# Altium PCB DA13_FPGA_edition.PcbDoc (part 1 of 3)
Units mm, origin at the board's own origin, x right, y up, seen from the top; angles counter-clockwise.
Board outline 118.01 x 92.01 mm, 2 copper layers (Top Layer, Bottom Layer); 473 components, 250 nets, 1417 pads, 16 vias.
Unrouted connection lines stored in the file: 993.
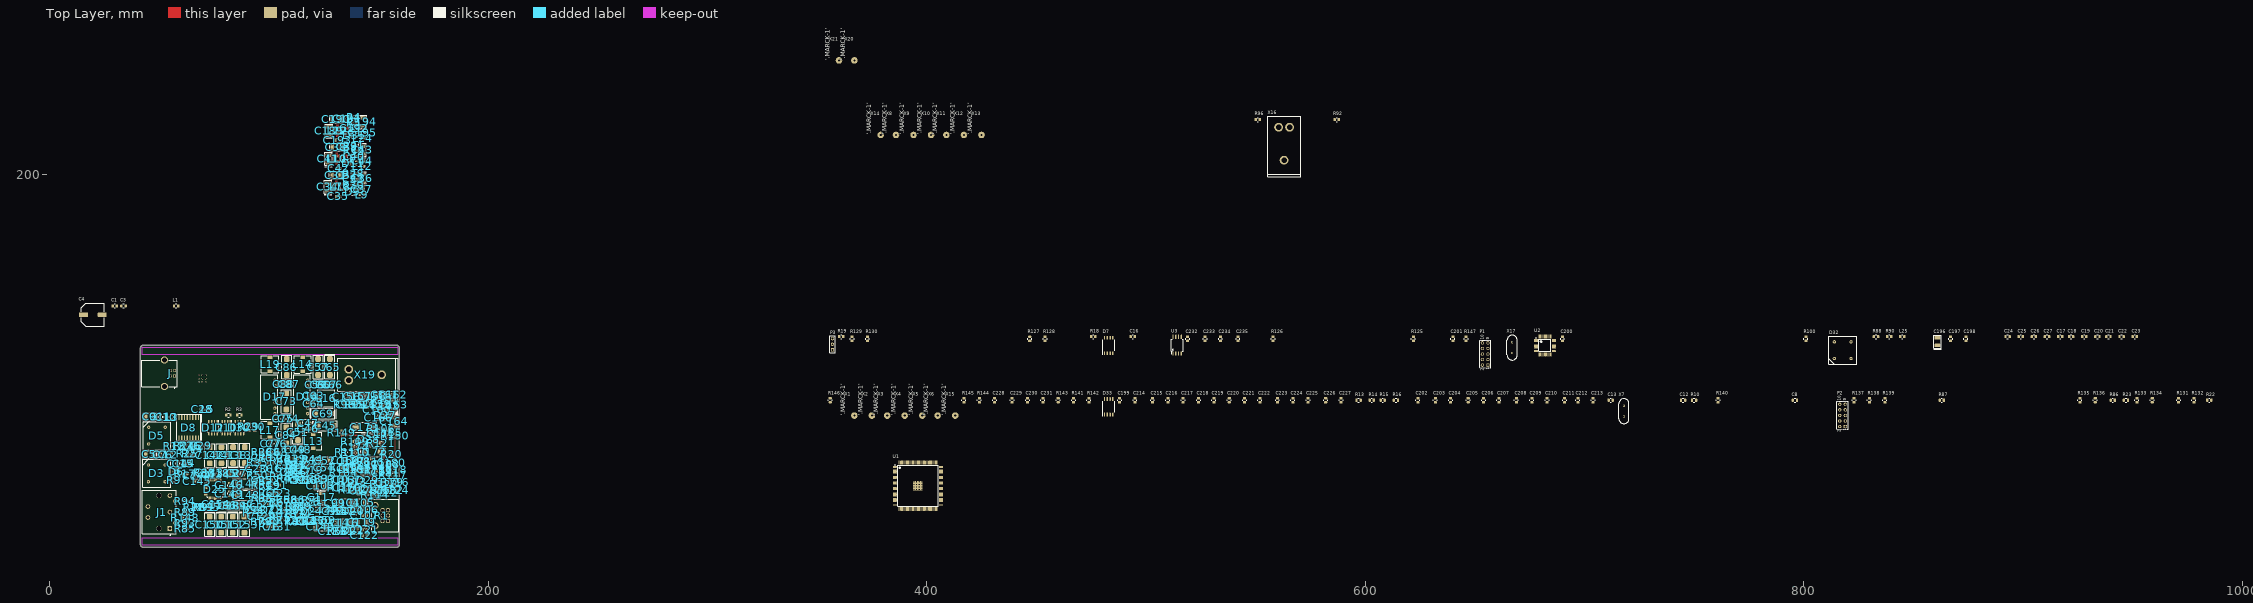
[diagram p0: Top Layer view]
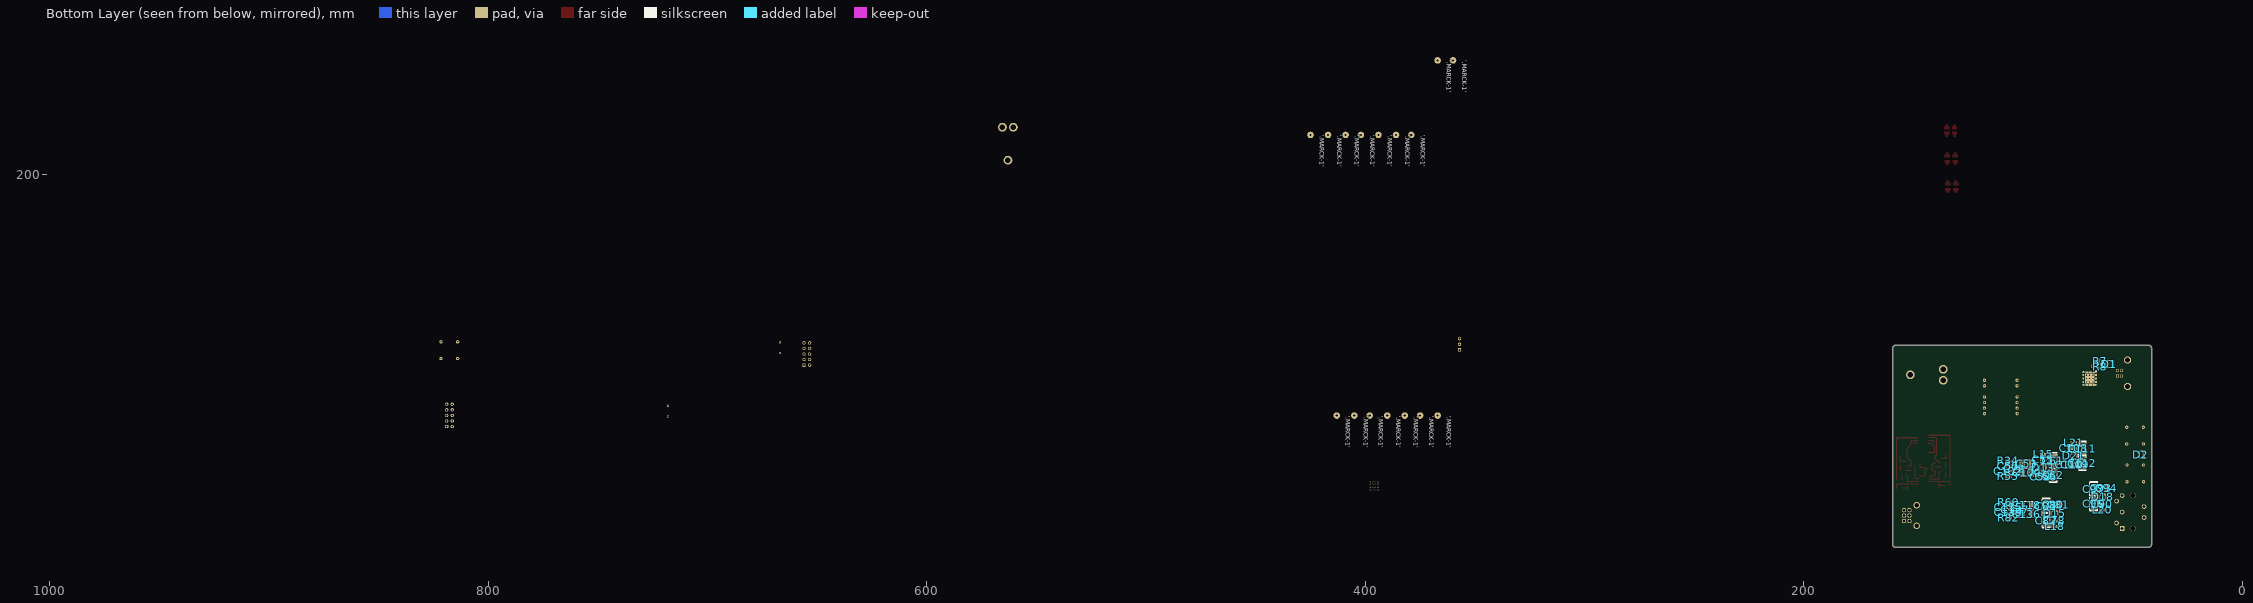
[diagram p1: Bottom Layer view, seen from below]

## Layer stack, top to bottom
Top Solder: solder mask 0.0102, Solder Resist, Dk 3.5
Top Layer: signal copper 0.0356
Dielectric 1: dielectric 0.32, FR-4, Dk 4.8
Bottom Layer: signal copper 0.0356
Bottom Solder: solder mask 0.0102, Solder Resist, Dk 3.5

## Board outline
41.396,31.104 ccw(c42.501,31.104) 42.501,29.999 158.301,29.999 ccw(c158.301,31.104) 159.406,31.104 159.406,120.904 ccw(c158.301,120.904) 158.301,122.009 42.501,122.009 ccw(c42.501,120.904) 41.396,120.904

## Design rules (kind name [scope] priority, off if disabled: settings)
Clearance [All] p1: gap=0.2 ignorepadtopadclearanceinfootprint=FALSE
PolygonConnect [All] p1: connectstyle=Relief reliefconductorwidth=0.254 reliefentries=4 polygonreliefangle="90 Angle" airgapwidth=0.254
RoutingVias [All] p1: holewidth=0.711 width=1.27 viastyle="Through Hole" minholewidth=0.711 minwidth=1.27 maxholewidth=0.711 maxwidth=1.27
SolderMaskExpansion [All] p1: expansion=0.102 istentingtop=FALSE
Width [All] p1: maxlimit=1 minlimit=0.254 preferedwidth=0.254
30 further rules are at their usual default settings.

## Classes and differential pairs
component class ha: C155 C156 C157 C158 C159 C160 C161 C162 C163 C164 C165 C166 C167 C168 C169 C170 C171 C172 C173 C174 C175 C176 C177 C178 C179 C180 C181 C182 C187 C188 D26 D27 D28 D29 R1 R11 R20 R98 R99 R101 R102 R103 R104 R105 R106 R107 R108 R109 R110 R111 R112 R113 R114 R115 R116 R117 R118 R119 R120 R121 R122 R123 R124 R149 R150 X19 X20 X21
component class DAC_4493: C2 C45 C46 C47 C48 C49 C50 C51 C52 C53 C54 C55 C56 C57 C58 C59 C60 C61 C62 C63 C64 C65 C66 C67 C68 C69 C70 C71 C72 C73 C74 C75 C76 C77 C78 C79 C80 C81 C82 C83 C84 C85 C86 C87 C88 C89 C90 C91 C92 C93 C94 C95 C96 C97 C98 C99 C100 C101 C102 C103 C104 C105 C106 C107 C108 C109 C110 C111 C112 C113 C114 C115 C116 C117 C118 C119 C120 C121 C122 C123 C124 C125 C126 C127 C128 C129 C130 C131 C132 C133 C134 C135 C136 C137 C138 C139 C140 C141 C142 C143 C144 C145 C146 C147 C148 C149 C150 C151 C152 C153 C154 C183 C184 C185 C186 C236 C237 D13 D14 D15 D16 D17 D18 D19 D20 D21 D22 D23 D24 D25 J1 L13 L14 L15 L16 L17 L18 L19 L20 L21 R6 R21 R33 R34 R35 R36 R37 R38 R39 R40 R41 R42 R43 R44 R45 R46 R47 R48 R49 R50 R51 R52 R53 R54 R55 R56 R57 R58 R59 R60 R61 R62 R63 R64 R65 R66 R67 R68 R69 R70 R71 R72 R73 R74 R75 R76 R77 R78 R79 R80 R81 R82 R83 R84 R85 R89 R91 R92 R93 R94 R95 R96 R97 R148 X8 X9 X10 X11 X12 X13 X14 X16
component class da12-mb: C1 C3 C4 C5 C6 C7 C8 C9 C10 C11 C12 C13 C14 C15 C16 C17 C18 C19 C20 C21 C22 C23 C24 C25 C26 C27 C28 C29 C30 C31 C32 C33 C34 C35 C36 C37 C38 C39 C40 C41 C42 C43 C44 C189 C190 C191 C192 C193 C194 C195 C196 C197 C198 C199 C200 C201 C202 C203 C204 C205 C206 C207 C208 C209 C210 C211 C212 C213 C214 C215 C216 C217 C218 C219 C220 C221 C222 C223 C224 C225 C226 C227 C228 C229 C230 C231 C232 C233 C234 C235 D1 D2 D3 D4 D5 D6 D7 D8 D9 D10 D11 D12 D30 D31 D32 D33 J L1 L2 L3 L4 L5 L6 L7 L8 L9 L10 L11 L12 L22 L23 L24 L25 P1 P2 P3 R2 R3 R4 R5 R7 R8 R9 R10 R12 R13 R14 R15 R16 R17 R18 R19 R22 R23 R24 R25 R26 R27 R28 R29 R30 R31 R32 R86 R87 R88 R90 R100 R125 R126 R127 R128 R129 R130 R131 R132 R133 R134 R135 R136 R137 R138 R139 R140 R141 R142 R143 R144 R145 R146 R147 U1 U2 U3 X1 X2 X3 X4 X5 X6 X7 X15 X17

## Components (designator, comment, footprint, x,y, rotation, side; value= is the part's Value field where it differs from the comment)
C1 "CC0805MRX7R9BB104" CAPC200X125X95L50N 29.647,140 r0 top value=0.1u
C2 "Обозначение при заказе" TANT_B 82.1,63.625 r0 top
C3 "CC0805MRX7R9BB104" CAPC200X125X95L50N 33.647,140 r0 top value=0.1u
C4 "EEEFK1A102AP" CAPAE1030X1050L320X90N 19.647,136 r0 top value=1mX10V
C5 "Обозначение при заказе" TANT_B 47.235,72.253 r180 top
C6 "CC0805JRNPO9BN160" CAPC200X125X95L50N 52.996,72.101 r90 top value=16p
C7 "CC0805MRX7R9BB104" CAPC200X125X95L50N 50.491,72.101 r90 top value=0.1u
C8 "CC0805MRX7R9BB104" CAPC200X125X95L50N 796,97 r0 top value=0.1u
C9 "Обозначение при заказе" TANT_B 47.335,89.469 r180 top
C10 "CC0805JRNPO9BN160" CAPC200X125X95L50N 53.096,89.35 r90 top value=16p
C11 "CC0805MRX7R9BB104" CAPC200X125X95L50N 50.591,89.4 r90 top value=0.1u
C12 "CC0805JRNPO7BN220" CAPC200X125X95L50N 745,97 r0 top value=22p
C13 "CC0805JRNPO7BN220" CAPC200X125X95L50N 712,97 r0 top value=22p
C14 "CC0805JRNPO9BN160" CAPC200X125X95L50N 58.4,68.134 r90 top value=16p
C15 "CC0805MRX7R9BB104" CAPC200X125X95L50N 60.904,68.134 r90 top value=0.1u
C16 "CC0805MRX7R9BB104" CAPC200X125X95L50N 494,126 r0 top value=0.1u
C17 "CC0805MRX7R9BB104" CAPC200X125X95L50N 917,126 r0 top value=0.1u
C18 "CC0805MRX7R9BB104" CAPC200X125X95L50N 922,126 r0 top value=0.1u
C19 "CC0805MRX7R9BB104" CAPC200X125X95L50N 928,126 r0 top value=0.1u
C20 "CC0805MRX7R9BB104" CAPC200X125X95L50N 934,126 r0 top value=0.1u
C21 "CC0805MRX7R9BB104" CAPC200X125X95L50N 939,126 r0 top value=0.1u
C22 "CC0805MRX7R9BB104" CAPC200X125X95L50N 945,126 r0 top value=0.1u
C23 "CC0805MRX7R9BB104" CAPC200X125X95L50N 951,126 r0 top value=0.1u
C24 "CC0805MRX7R9BB104" CAPC200X125X95L50N 893,126 r0 top value=0.1u
C25 "CC0805MRX7R9BB104" CAPC200X125X95L50N 899,126 r0 top value=0.1u
C26 "CC0805MRX7R9BB104" CAPC200X125X95L50N 905,126 r0 top value=0.1u
C27 "CC0805MRX7R9BB104" CAPC200X125X95L50N 911,126 r0 top value=0.1u
C28 "CC0805MRX7R9BB104" CAPC200X125X95L50N 69.496,92.8 r270 top value=0.1u
C29 "CC0805MRX7R9BB104" CAPC200X125X95L50N 69.013,76.3 r270 top value=0.1u
C30 "GRM31CR71A226KE15L" CAPC320X160X180L55 93.5,84.8 r270 top value=22u
C31 "Обозначение при заказе" TANT_B 132.289,199.523 r180 top
C32 "CC0805MRX7R9BB104" CAPC200X125X95L50N 135.546,199.673 r270 top value=0.1u
C33 "CC0805MRX7R9BB101" CAPC200X125X95L50N 138.65,197.761 r180 top value=100p
C34 "Обозначение при заказе" TANT_B 126.889,192.514 r90 top
C35 "CC0805MRX7R9BB104" CAPC200X125X95L50N 131.6,189.962 r180 top value=0.1u
C36 "Обозначение при заказе" TANT_B 142.556,196.523 r90 top
C37 "CC0805MRX7R9BB104" CAPC200X125X95L50N 142.4,193.266 r180 top value=0.1u
C38 "Обозначение при заказе" TANT_B 132.439,212.339 r180 top
C39 "CC0805MRX7R9BB104" CAPC200X125X95L50N 135.696,212.539 r270 top value=0.1u
C40 "CC0805MRX7R9BB101" CAPC200X125X95L50N 138.8,208.174 r180 top value=100p
C41 "Обозначение при заказе" TANT_B 127.125,205.331 r90 top
C42 "CC0805MRX7R9BB104" CAPC200X125X95L50N 131.8,202.779 r180 top value=0.1u
C43 "Обозначение при заказе" TANT_B 142.656,209.439 r90 top
C44 "CC0805MRX7R9BB104" CAPC200X125X95L50N 142.6,206.183 r180 top value=0.1u
C45 "Обозначение при заказе" TANT_D 122.2,85.3 r0 top
C46 "CC0805MRX7R9BB104" CAPC200X125X95L50N 117.894,83.993 r180 top value=0.1u
C47 "CC0805MRX7R9BB104" CAPC200X125X95L50N 117.894,86.5 r180 top value=0.1u
C48 "CC0805MRX7R9BB104" CAPC200X125X95L50N 114.511,74.525 r270 top value=0.1u
C49 "CC0805MRX7R9BB104" CAPC200X125X95L50N 112.006,74.526 r270 top value=0.1u
C50 "CC0805MRX7R9BB104" CAPC200X125X95L50N 106.65,66.975 r180 bottom value=0.1u
C51 "Обозначение при заказе" TANT_D 113.2,78.832 r90 top
C52 "Обозначение при заказе" TANT_B 123.875,69.45 r0 top
C53 "Обозначение при заказе" TANT_B 96.475,67.95 r0 bottom
C54 "CC0805MRX7R9BB104" CAPC200X125X95L50N 125.125,66.275 r0 top value=0.1u
C55 "CC0805MRX7R9BB104" CAPC200X125X95L50N 90.761,69.8 r0 bottom value=0.1u
C56 "CC0805MRX7R9BB104" CAPC200X125X95L50N 89.456,62.2 r270 bottom value=0.1u
C57 "Обозначение при заказе" TANT_D 122.4,108.5 r90 top
C58 "CC0805MRX7R9BB104" CAPC200X125X95L50N 91.961,62.2 r270 bottom value=0.1u
C59 "CC0805MRX7R9BB104" CAPC200X125X95L50N 121.4,104.15 r270 top value=0.1u
C60 "CC0805MRX7R9BB104" CAPC200X125X95L50N 123.904,104.15 r270 top value=0.1u
C61 "Обозначение при заказе" TANT_B 86.2,71.2 r270 bottom
C62 "Обозначение при заказе" TANT_B 86.2,61.1 r90 bottom
C63 "CC0805MRX7R9BB104" CAPC200X125X95L50N 120.4,99.05 r270 top value=0.1u
C64 "CC0805MRX7R9BB104" CAPC200X125X95L50N 120.4,95.346 r90 top value=0.1u
C65 "Обозначение при заказе" TANT_D 127.8,115.8 r270 top
C66 "CC0805MRX7R9BB104" CAPC200X125X95L50N 128.913,104.15 r90 top value=0.1u
C67 "CC0805MRX7R9BB104" CAPC200X125X95L50N 126.409,104.15 r90 top value=0.1u
C68 "CC0805MRX7R9BB104" CAPC200X125X95L50N 103.9,73.175 r0 top value=0.1u
C69 "Обозначение при заказе" TANT_D 128.378,90.939 r180 top
C70 "CC0805MRX7R9BB104" CAPC200X125X95L50N 96.9,70.875 r0 top value=0.1u
C71 "CC0805MRX7R9BB104" CAPC200X125X95L50N 116.975,69.5 r90 top value=0.1u
C72 "CC0805MRX7R9BB104" CAPC200X125X95L50N 103.675,65.775 r270 bottom value=0.1u
C73 "Обозначение при заказе" TANT_D 107.9,92.8 r90 top
C74 "CC0805MRX7R9BB104" CAPC200X125X95L50N 109.104,88.494 r270 top value=0.1u
C75 "CC0805MRX7R9BB104" CAPC200X125X95L50N 106.6,88.494 r270 top value=0.1u
C76 "CC0805MRX7R9BB104" CAPC200X125X95L50N 103.504,77.146 r270 top value=0.1u
C77 "CC0805MRX7R9BB104" CAPC200X125X95L50N 101,77.146 r270 top value=0.1u
C78 "CC0805MRX7R9BB104" CAPC200X125X95L50N 85.537,41.971 r180 bottom value=0.1u
C79 "CC0805MRX7R9BB104" CAPC200X125X95L50N 107.675,65.775 r90 top value=0.1u
C80 "CC0805MRX7R9BB104" CAPC200X125X95L50N 86.123,49.4 r90 bottom value=0.1u
C81 "CC0805MRX7R9BB104" CAPC200X125X95L50N 83.619,49.4 r90 bottom value=0.1u
C82 "Обозначение при заказе" TANT_B 89.393,40.386 r90 bottom
C83 "Обозначение при заказе" TANT_B 89.379,50.486 r270 bottom
C84 "Обозначение при заказе" TANT_D 107.9,77.387 r90 top
C85 "CC0805MRX7R9BB104" CAPC200X125X95L50N 96.85,60.575 r180 top value=0.1u
C86 "Обозначение при заказе" TANT_D 108.1,108.5 r90 top
C87 "CC0805MRX7R9BB104" CAPC200X125X95L50N 109.202,104.194 r270 top value=0.1u
C88 "CC0805MRX7R9BB104" CAPC200X125X95L50N 106.698,104.194 r270 top value=0.1u
C89 "CC0805MRX7R9BB104" CAPC200X125X95L50N 122.2,61.1 r180 top value=0.1u
C90 "CC0805MRX7R9BB104" CAPC200X125X95L50N 63.844,49.486 r180 bottom value=0.1u
C91 "CC0805MRX7R9BB104" CAPC200X125X95L50N 103.875,58.275 r0 top value=0.1u
C92 "CC0805MRX7R9BB104" CAPC200X125X95L50N 114.675,60.55 r270 top value=0.1u
C93 "CC0805MRX7R9BB104" CAPC200X125X95L50N 64.344,56.914 r90 bottom value=0.1u
C94 "CC0805MRX7R9BB104" CAPC200X125X95L50N 61.839,56.914 r90 bottom value=0.1u
C95 "CC0805MRX7R9BB104" CAPC200X125X95L50N 110.05,64.05 r90 top value=0.1u
C96 "Обозначение при заказе" TANT_B 67.7,48 r90 bottom
C97 "Обозначение при заказе" TANT_B 67.7,58.1 r270 bottom
C98 "CC0805MRX7R9BB104" CAPC200X125X95L50N 129.131,46.352 r270 top value=0.1u
C99 "CC0805MRX7R9BB104" CAPC200X125X95L50N 130.259,50.056 r90 top value=0.1u
C100 "Обозначение при заказе" TANT_B 99.925,64 r180 bottom
C101 "CC0805MRX7R9BB104" CAPC200X125X95L50N 119.3,60.525 r90 top value=0.1u
C102 "CC0805MRX7R9BB104" CAPC200X125X95L50N 106.625,64.65 r0 bottom value=0.1u
C103 "Обозначение при заказе" TANT_B 125.35,58 r180 top
C104 "Обозначение при заказе" TANT_B 133.516,50.252 r0 top
C105 "Обозначение при заказе" TANT_B 143.616,50.252 r180 top
C106 "CC0805MRX7R9BB104" CAPC200X125X95L50N 143.716,46.995 r0 top value=0.1u
C107 "CC0805MRX7R9BB104" CAPC200X125X95L50N 143.716,44.491 r0 top value=0.1u
C108 "CC0805MRX7R9BB104" CAPC200X125X95L50N 76.77,75.014 r0 bottom value=0.1u
C109 "CC0805MRX7R9BB104" CAPC200X125X95L50N 76.17,67.5 r270 bottom value=0.1u
C110 "CC0805MRX7R9BB104" CAPC200X125X95L50N 78.674,67.5 r270 bottom value=0.1u
C111 "Обозначение при заказе" TANT_B 72.914,76.608 r270 bottom
C112 "Обозначение при заказе" TANT_B 72.914,66.6 r90 bottom
C113 "CC0805MRX7R9BB104" CAPC200X125X95L50N 129.031,37.335 r270 top value=0.1u
C114 "CC0805MRX7R9BB104" CAPC200X125X95L50N 130.159,41.083 r90 top value=0.1u
C115 "CC0805MRX7R9BB104" CAPC200X125X95L50N 106.425,48.15 r180 bottom value=0.1u
C116 "Обозначение при заказе" TANT_B 136.416,41.192 r180 top
C117 "Обозначение при заказе" TANT_B 124,50.992 r90 top
C118 "Обозначение при заказе" TANT_B 96.525,49.025 r0 bottom
C119 "Обозначение при заказе" TANT_B 140.516,41.235 r0 top
C120 "CC0805MRX7R9BB104" CAPC200X125X95L50N 125.15,47.6 r0 top value=0.1u
C121 "CC0805MRX7R9BB104" CAPC200X125X95L50N 143.716,37.935 r0 top value=0.1u
C122 "CC0805MRX7R9BB104" CAPC200X125X95L50N 143.716,35.431 r0 top value=0.1u
C123 "CC0805MRX7R9BB104" CAPC200X125X95L50N 103.825,54.5 r0 top value=0.1u
C124 "CC0805MRX7R9BB104" CAPC200X125X95L50N 96.8,49.85 r0 top value=0.1u
C125 "CC0805MRX7R9BB104" CAPC200X125X95L50N 109.925,48.675 r90 top value=0.1u
C126 "CC0805MRX7R9BB104" CAPC200X125X95L50N 116.95,50.7 r90 top value=0.1u
C127 "CC0805MRX7R9BB104" CAPC200X125X95L50N 103.5,46.95 r270 bottom value=0.1u
C128 "CC0805MRX7R9BB104" CAPC200X125X95L50N 107.625,46.95 r270 top value=0.1u
C129 "CC0805MRX7R9BB104" CAPC200X125X95L50N 96.75,44 r180 top value=0.1u
C130 "CC0805MRX7R9BB104" CAPC200X125X95L50N 122.175,42.3 r180 top value=0.1u
C131 "CC0805MRX7R9BB104" CAPC200X125X95L50N 103.825,39.375 r0 top value=0.1u
C132 "CC0805MRX7R9BB104" CAPC200X125X95L50N 114.625,41.7 r270 top value=0.1u
C133 "CC0805MRX7R9BB104" CAPC200X125X95L50N 109.925,45.2 r90 top value=0.1u
C134 "CC0805MRX7R9BB104" CAPC200X125X95L50N 76,63.1 r180 top value=0.1u
C135 "Обозначение при заказе" TANT_D 88.925,68.331 r90 top
C136 "Обозначение при заказе" TANT_B 100.05,45.05 r180 bottom
C137 "CC0805MRX7R9BB104" CAPC200X125X95L50N 119.25,41.7 r90 top value=0.1u
C138 "Обозначение при заказе" TANT_D 83.625,68.331 r90 top
C139 "CC0805MRX7R9BB104" CAPC200X125X95L50N 106.425,45.825 r0 bottom value=0.1u
C140 "Обозначение при заказе" TANT_B 125.35,39.2 r180 top
C141 "Обозначение при заказе" TANT_D 78.325,68.225 r90 top
C142 "Обозначение при заказе" TANT_D 73.025,68.225 r90 top
C143 "CC0805MRX7R9BB104" CAPC200X125X95L50N 73.05,64.025 r270 top value=0.1u
C144 "CC0805MRX7R9BB104" CAPC200X125X95L50N 67.275,62.5 r0 top value=0.1u
C145 "CC0805KKX7R9BB105" CAPC200X125X95L50N 67.275,60.15 r0 top value=1u
C146 "CC0805MRX7R9BB104" CAPC200X125X95L50N 81.988,58.179 r270 top value=0.1u
C147 "Обозначение при заказе" TANT_D 85.694,58.925 r0 top
C148 "Обозначение при заказе" TANT_D 85.694,53.675 r0 top
C149 "CC0805MRX7R9BB104" CAPC200X125X95L50N 81.988,54.425 r270 top value=0.1u
C150 "Обозначение при заказе" TANT_D 72.936,43.869 r270 top
C151 "Обозначение при заказе" TANT_D 78.225,43.869 r270 top
C152 "Обозначение при заказе" TANT_D 83.525,43.869 r270 top
C153 "Обозначение при заказе" TANT_D 88.825,43.869 r270 top
C154 "CC0805MRX7R9BB104" CAPC200X125X95L50N 75.9,49.625 r0 top value=0.1u
C155 "CC0805MRX7R9BB104" CAPC200X125X95L50N 137.019,94.835 r270 top value=0.1u
C156 "CC0805MRX7R9BB104" CAPC200X125X95L50N 135.4,98.68 r90 top value=0.1u
C157 "Обозначение при заказе" TANT_B 138.7,98.742 r0 top
C158 "Обозначение при заказе" TANT_B 149.1,98.742 r180 top
C159 "CC0805MRX7R9BB104" CAPC200X125X95L50N 149.3,95.084 r0 top value=0.1u
C160 "CC0805MRX7R9BB104" CAPC200X125X95L50N 149.3,92.58 r0 top value=0.1u
C161 "CC0805MRX7R9BB104" CAPC200X125X95L50N 153.059,99.594 r180 top value=0.1u
C162 "CC0805MRX7R9BB104" CAPC200X125X95L50N 156.768,99.594 r0 top value=0.1u
C163 "Обозначение при заказе" TANT_B 157.018,93.094 r90 top
C164 "Обозначение при заказе" TANT_B 157.1,89.085 r270 top
C165 "CC0805MRX7R9BB104" CAPC200X125X95L50N 154.411,82.15 r270 top value=0.1u
C166 "CC0805MRX7R9BB104" CAPC200X125X95L50N 150.013,89.1 r90 top value=0.1u
C167 "CC0805MRX7R9BB104" CAPC200X125X95L50N 135.696,60.787 r90 top value=0.1u
C168 "CC0805MRX7R9BB104" CAPC200X125X95L50N 134.991,69.517 r270 top value=0.1u
C169 "CC0805MRX7R9BB104" CAPC200X125X95L50N 137.496,65.496 r90 top value=0.1u
C170 "CC0805MRX7R9BB104" CAPC200X125X95L50N 135.704,57.083 r270 top value=0.1u
C171 "CC0805MRX7R9BB104" CAPC200X125X95L50N 151.306,81.4 r0 top value=0.1u
C172 "Обозначение при заказе" TANT_D 150.8,73.594 r180 top
C173 "Обозначение при заказе" TANT_D 147,84.6 r180 top
C174 "CC0805MRX7R9BB104" CAPC200X125X95L50N 139.3,75.596 r180 top value=0.1u
C175 "CC0805MRX7R9BB104" CAPC200X125X95L50N 146.8,65.346 r270 top value=0.1u
C176 "CC0805MRX7R9BB104" CAPC200X125X95L50N 148.4,56.391 r0 top value=0.1u
C177 "Обозначение при заказе" TANT_B 143.5,65.6 r90 top
C178 "Обозначение при заказе" TANT_B 141.465,55.639 r0 top
C179 "CC0805MRX7R9BB104" CAPC200X125X95L50N 155.004,59.683 r90 top value=0.1u
C180 "CC0805MRX7R9BB104" CAPC200X125X95L50N 156.1,68.5 r270 top value=0.1u
C181 "CC0805MRX7R9BB104" CAPC200X125X95L50N 153.3,63.9 r90 top value=0.1u
C182 "CC0805MRX7R9BB104" CAPC200X125X95L50N 155.004,55.979 r270 top value=0.1u
C183 "CC0805MRX7R9BB104" CAPC200X125X95L50N 110.05,67.5 r90 top value=0.1u
C184 "Обозначение при заказе" TANT_B 82,48.9 r0 top
C185 "CC0805MRX7R9BB104" CAPC200X125X95L50N 78.9,63.7 r90 top value=0.1u
C186 "CC0805MRX7R9BB104" CAPC200X125X95L50N 78.85,49 r270 top value=0.1u
C187 "CC0805MRX7R9BB104" CAPC200X125X95L50N 137.496,69.204 r270 top value=0.1u
C188 "CC0805MRX7R9BB104" CAPC200X125X95L50N 153.3,67.9 r270 top value=0.1u
C189 "Обозначение при заказе" TANT_B 127.425,218.192 r90 top
C190 "Обозначение при заказе" TANT_B 132.4,225.2 r180 top
C191 "CC0805MRX7R9BB104" CAPC200X125X95L50N 135.656,225.4 r270 top value=0.1u
C192 "CC0805MRX7R9BB101" CAPC200X125X95L50N 138.9,221.034 r180 top value=100p
C193 "CC0805MRX7R9BB104" CAPC200X125X95L50N 131.281,215.596 r180 top value=0.1u
C194 "Обозначение при заказе" TANT_B 142.756,222.3 r90 top
C195 "CC0805MRX7R9BB104" CAPC200X125X95L50N 142.814,219.044 r180 top value=0.1u
C196 "Обозначение при заказе" TANT_B 861,122 r90 top
C197 "CC0805JRNPO9BN160" CAPC200X125X95L50N 867,125 r90 top value=16p
C198 "CC0805MRX7R9BB104" CAPC200X125X95L50N 874,125 r90 top value=0.1u
C199 "CC0805MRX7R9BB104" CAPC200X125X95L50N 488,97 r90 top value=0.1u
C200 "CC0805JRNPO7BN220" CAPC200X125X95L50N 690,125 r90 top value=22p
C201 "CC0805JRNPO7BN220" CAPC200X125X95L50N 640,125 r90 top value=22p
C202 "CC0805MRX7R9BB104" CAPC200X125X95L50N 624,97 r90 top value=0.1u
C203 "CC0805MRX7R9BB104" CAPC200X125X95L50N 632,97 r90 top value=0.1u
C204 "CC0805MRX7R9BB104" CAPC200X125X95L50N 639,97 r90 top value=0.1u
C205 "CC0805MRX7R9BB104" CAPC200X125X95L50N 647,97 r90 top value=0.1u
C206 "CC0805MRX7R9BB104" CAPC200X125X95L50N 654,97 r90 top value=0.1u
C207 "CC0805MRX7R9BB104" CAPC200X125X95L50N 661,97 r90 top value=0.1u
C208 "CC0805MRX7R9BB104" CAPC200X125X95L50N 669,97 r90 top value=0.1u
C209 "CC0805MRX7R9BB104" CAPC200X125X95L50N 676,97 r90 top value=0.1u
C210 "CC0805MRX7R9BB104" CAPC200X125X95L50N 683,97 r90 top value=0.1u
C211 "CC0805MRX7R9BB104" CAPC200X125X95L50N 691,97 r90 top value=0.1u
C212 "CC0805MRX7R9BB104" CAPC200X125X95L50N 697,97 r90 top value=0.1u
C213 "CC0805MRX7R9BB104" CAPC200X125X95L50N 704,97 r90 top value=0.1u
C214 "CC0805MRX7R9BB104" CAPC200X125X95L50N 495,97 r90 top value=0.1u
C215 "CC0805MRX7R9BB104" CAPC200X125X95L50N 503,97 r90 top value=0.1u
C216 "CC0805MRX7R9BB104" CAPC200X125X95L50N 510,97 r90 top value=0.1u
C217 "CC0805MRX7R9BB104" CAPC200X125X95L50N 517,97 r90 top value=0.1u
C218 "CC0805MRX7R9BB104" CAPC200X125X95L50N 524,97 r90 top value=0.1u
C219 "CC0805MRX7R9BB104" CAPC200X125X95L50N 531,97 r90 top value=0.1u
C220 "CC0805MRX7R9BB104" CAPC200X125X95L50N 538,97 r90 top value=0.1u
C221 "CC0805MRX7R9BB104" CAPC200X125X95L50N 545,97 r90 top value=0.1u
C222 "CC0805MRX7R9BB104" CAPC200X125X95L50N 552,97 r90 top value=0.1u
C223 "CC0805MRX7R9BB104" CAPC200X125X95L50N 560,97 r90 top value=0.1u
C224 "CC0805MRX7R9BB104" CAPC200X125X95L50N 567,97 r90 top value=0.1u
C225 "CC0805MRX7R9BB104" CAPC200X125X95L50N 574,97 r90 top value=0.1u
C226 "CC0805MRX7R9BB104" CAPC200X125X95L50N 582,97 r90 top value=0.1u
C227 "CC0805MRX7R9BB104" CAPC200X125X95L50N 589,97 r90 top value=0.1u
C228 "CC0805MRX7R9BB104" CAPC200X125X95L50N 431,97 r90 top value=0.1u
C229 "CC0805MRX7R9BB104" CAPC200X125X95L50N 439,97 r90 top value=0.1u
C230 "CC0805MRX7R9BB104" CAPC200X125X95L50N 446,97 r90 top value=0.1u
C231 "CC0805MRX7R9BB104" CAPC200X125X95L50N 453,97 r90 top value=0.1u
C232 "CC0805MRX7R9BB104" CAPC200X125X95L50N 519,125 r90 top value=0.1u
C233 "CC0805MRX7R9BB104" CAPC200X125X95L50N 527,125 r90 top value=0.1u
C234 "CC0805MRX7R9BB104" CAPC200X125X95L50N 534,125 r90 top value=0.1u
C235 "CC0805MRX7R9BB104" CAPC200X125X95L50N 542,125 r90 top value=0.1u
C236 "CC0805MRX7R9BB104" CAPC200X125X95L50N 95.85,65.725 r270 top value=0.1u
C237 "CC0805MRX7R9BB104" CAPC200X125X95L50N 95.875,46.925 r270 top value=0.1u
D1 "USBLC6-4SC6" SOT23-6P95_280X145L45X40N 60.6,113.4 r0 bottom
D2 "SN74LVC1G14DBVR" SOT23-5P95_280X145L45X40N 46.2,72.1 r90 bottom value=SN74LVC1G14
D3 "Обозначение при заказе" DIL4 45,67.455 r270 top
D4 "Обозначение при заказе" "48-QFN (6x6)" 69.6,106.9 r270 bottom
D5 "Обозначение при заказе" DIL4 45.1,84.671 r270 top
D6 "Обозначение при заказе" SOT23-5P95_280X145L45X40N 57.7,64.334 r270 top
D7 "W25Q32JVSS" SOIC8P127_528X790X100L65X41N 483,122 r90 top value=W25Q32
D8 "Обозначение при заказе" adum1400 63.379,84.5 r180 top
D9 "Обозначение при заказе" SOT23-5P95_280X145L45X40N 138.3,192.123 r270 top
D10 "Обозначение при заказе" SOIC8P127_490X600X175L65X42N 80.5,84.5 r270 top
D11 "Обозначение при заказе" SOT23-5P95_280X145L45X40N 138.5,205.039 r270 top
D12 "Обозначение при заказе" SOIC8P127_490X600X175L65X42N 74.5,84.5 r270 top
D13 "Обозначение при заказе" SOT23-5P95_280X145L45X40N 90.861,66.3 r0 bottom
D14 "Обозначение при заказе" AM3D-0509DH30Z 116.33,106.12 r270 top
D15 "Обозначение при заказе" SOT23-5P95_280X145L45X40N 85.493,45.386 r180 bottom
D16 "Обозначение при заказе" SOIC8P127_490X600X175L65X42N 101.3,65.775 r90 top
D17 "Обозначение при заказе" AM3D-0509SZ 101.43,106.12 r270 top
D18 "Обозначение при заказе" SOT23-5P95_280X145L45X40N 63.7,52.9 r180 bottom
D19 "Обозначение при заказе" SOIC8P127_490X600X175L83X42N 119.625,65 r0 top
D20 "Обозначение при заказе" SOP65P490X110-9N 138.516,46.352 r0 top
D21 "Обозначение при заказе" SOT23-5P95_280X145L45X40N 76.8,71.6 r0 bottom
D22 "Обозначение при заказе" SOP65P490X110-9N 138.416,37.435 r0 top
D23 "Обозначение при заказе" SOIC8P127_490X600X175L65X42N 101.275,46.95 r90 top
D24 "Обозначение при заказе" SOIC8P127_490X600X175L83X42N 119.6,46.275 r0 top
D25 "Обозначение при заказе" QFP50P900X900X160-48N 75.373,56.461 r0 top
D26 "Обозначение при заказе" SOP65P490X110-9N 143.9,94.985 r0 top
D27 "Обозначение при заказе" SOP65P490X110-9N 153.018,90.209 r270 top
D28 "LM258DR" SOIC8P127_490X600X175L83X42N 145.5,79.194 r0 top value=LM258
D29 "LM258DR" SOIC8P127_490X600X175L83X42N 145.1,60.496 r0 top value=LM258
D30 "Обозначение при заказе" SOIC8P127_490X600X175L65X42N 86.5,84.5 r270 top
D31 "Обозначение при заказе" SOT23-5P95_280X145L45X40N 138.8,217.9 r270 top
D32 "Обозначение при заказе" DIL4 814,116 r0 top
D33 "W25Q32JVSS" SOIC8P127_528X790X100L65X41N 483,94 r90 top value=W25Q32
J "USB-B-S-X-X-TH-TR" SAMTEC_USB-B-S-X-X-TH-TR 52.3,109.3 r270 top
J1 "57PC5F" SWITCHCRAFT_57PC5F 49.8,46 r0 top
L1 "Обозначение при заказе" RESC200X125X60L35 57.647,140 r0 top
L2 "Обозначение при заказе" RESC200X125X60L35 55.5,72.101 r90 top
L3 "Обозначение при заказе" RESC200X125X60L35 55.6,89.35 r90 top
L4 "Обозначение при заказе" RESC200X125X60L35 63.409,68.184 r90 top
L5 "Обозначение при заказе" RESC200X125X60L35 72,92.8 r270 top
L6 "Обозначение при заказе" RESC200X125X60L35 66.509,76.3 r270 top
L7 "LQH2MCN220K02L" INDM320X250X220L90X200N 130.696,194.366 r90 top value=1210
L8 "LQH2MCN220K02L" INDM320X250X220L90X200N 134.3,194.366 r270 top value=1210
L9 "Обозначение при заказе" RESC200X125X60L35 142.4,190.762 r0 top
L10 "LQH2MCN220K02L" INDM320X250X220L90X200N 130.931,207.183 r90 top value=1210
L11 "LQH2MCN220K02L" INDM320X250X220L90X200N 134.536,207.183 r270 top value=1210
L12 "Обозначение при заказе" RESC200X125X60L35 142.514,203.679 r180 top
L13 "CDRH74NP-471MC" INDM730X730X450L90X180N 120.2,78.339 r270 top value=CDRH74
L14 "CDRH74NP-471MC" INDM730X730X450L90X180N 115.4,113.356 r270 top value=CDRH74
L15 "Обозначение при заказе" RESC200X125X60L35 90.8,72.304 r180 bottom
L16 "CDRH74NP-471MC" INDM730X730X450L90X180N 126.1,97.896 r0 top value=CDRH74
L17 "CDRH74NP-471MC" INDM730X730X450L90X180N 100.4,83.4 r270 top value=CDRH74
L18 "Обозначение при заказе" RESC200X125X60L35 85.537,39.467 r0 bottom
L19 "CDRH74NP-471MC" INDM730X730X450L90X180N 100.5,113.4 r270 top value=CDRH74
L20 "Обозначение при заказе" RESC200X125X60L35 63.844,46.981 r0 bottom
L21 "Обозначение при заказе" RESC200X125X60L35 76.77,77.519 r180 bottom
L22 "LQH2MCN220K02L" INDM320X250X220L90X200N 131.231,220 r90 top value=1210
L23 "LQH2MCN220K02L" INDM320X250X220L90X200N 134.836,220 r270 top value=1210
L24 "Обозначение при заказе" RESC200X125X60L35 142.814,216.539 r0 top
L25 "Обозначение при заказе" RESC200X125X60L35 845,126 r0 top
P1 "SWD" HDR2X5 656,113 r90 top
P2 "FPGA_JTAG" HDR2X5 819,85 r90 top
P3 "MCU_UART" HDR1X3 357,120 r90 top
R1 "Обозначение при заказе" RK09L 154.3,44.4 r0 top
R2 "RC0805JR-0710KL" RESC200X125X60L35 81.5,90.2 r0 top value=10k
R3 "RC0805JR-0710KL" RESC200X125X60L35 86.5,90.2 r0 top value=10k
R4 "RC0805JR-0710KL" RESC200X125X60L35 138.9,226.043 r180 top value=10k
R5 "RC0805JR-0710KL" RESC200X125X60L35 138.9,223.539 r0 top value=10k
R6 "RC0805JR-0747RL" RESC200X125X60L35 68.3,48.3 r90 top value=10k
R7 "RC0805JR-0724RL" RESC200X125X60L35 64.75,114.704 r0 bottom value=24
R8 "RC0805JR-0724RL" RESC200X125X60L35 64.75,112.2 r0 bottom value=24
R9 "RC0805JR-0710RL" RESC200X125X60L35 56.7,60.6 r90 top value=10
R10 "RC0805JR-0718RL" RESC200X125X60L35 750,97 r0 top value=18
R11 "RC0805JR-071KL" RESC200X125X60L35 135,73.3 r270 top value=1k
R12 "RC0805JR-0710RL" RESC200X125X60L35 56.9,76.1 r270 top value=10
R13 "RC0805JR-0710RL" RESC200X125X60L35 597,97 r0 top value=10
R14 "RC0805JR-0710RL" RESC200X125X60L35 603,97 r0 top value=10
R15 "RC0805JR-0710RL" RESC200X125X60L35 608,97 r0 top value=10
R16 "RC0805JR-0710RL" RESC200X125X60L35 614,97 r0 top value=10
R17 "RC0805JR-0710RL" RESC200X125X60L35 61.714,63.434 r0 top value=10
R18 "RC0805JR-07100KL" RESC200X125X60L35 476,126 r0 top value=100k
R19 "RC0805JR-07100KL" RESC200X125X60L35 361,126 r0 top value=100k
R20 "RC0805JR-071KL" RESC200X125X60L35 156.1,72.3 r270 top value=1k
R21 "RC0805JR-0747RL" RESC200X125X60L35 65.975,48.275 r90 top value=10k
R22 "RC0805JR-0710RL" RESC200X125X60L35 985,97 r0 top value=10
R23 "RC0805JR-0710RL" RESC200X125X60L35 947,97 r0 top value=10
R24 "RC0805JR-0710RL" RESC200X125X60L35 61.5,76.3 r90 top value=10
R25 "RC0805JR-0710RL" RESC200X125X60L35 62.8,72.596 r90 top value=10
R26 "RC0805JR-0710RL" RESC200X125X60L35 64.004,76.3 r90 top value=10
R27 "RC0805JR-0710RL" RESC200X125X60L35 65.304,72.596 r90 top value=10
R28 "RC0805JR-0710KL" RESC200X125X60L35 138.7,200.265 r180 top value=10k
R29 "RC1206JR-07200KL" RESC310X160X65L40N 90.8,84.8 r270 top value=200k
R30 "RC0805JR-0710KL" RESC200X125X60L35 138.6,195.257 r0 top value=10k
R31 "RC0805JR-0710KL" RESC200X125X60L35 138.8,213.182 r180 top value=10k
R32 "RC0805JR-0710KL" RESC200X125X60L35 138.8,210.678 r0 top value=10k
R33 "RC0805JR-0710RL" RESC200X125X60L35 125.775,61.1 r180 top value=10
R34 "RC0805JR-0710RL" RESC200X125X60L35 106.65,69.325 r180 bottom value=10
R35 "RC0805JR-072K2L" RESC200X125X60L35 94.9,68.575 r0 top value=2k2
R36 "RC0805JR-072K2L" RESC200X125X60L35 96.9,73.175 r0 top value=2k2
R37 "RC0805JR-072K2L" RESC200X125X60L35 100.4,70.875 r0 top value=2k2
R38 "RC0805JR-072K2L" RESC200X125X60L35 100.4,73.175 r0 top value=2k2
R39 "RC0805JR-072K2L" RESC200X125X60L35 112.125,70.375 r0 top value=2k2
R40 "RC0805JR-0710RL" RESC200X125X60L35 105.3,69.425 r90 top value=10
R41 "RC0805JR-072K2L" RESC200X125X60L35 108.6,70.375 r0 top value=2k2
R42 "RC0805JR-072K2L" RESC200X125X60L35 114.65,67.525 r90 top value=2k2
R43 "RC0805JR-072K2L" RESC200X125X60L35 112.35,67.5 r270 top value=2k2
R44 "RC0805JR-0710RL" RESC200X125X60L35 119.875,70.1 r180 top value=10
R45 "RC0805JR-072K2L" RESC200X125X60L35 108.6,61.175 r0 top value=2k2
R46 "RC0805JR-072K2L" RESC200X125X60L35 112.35,64.05 r90 top value=2k2
R47 "RC0805JR-072K2L" RESC200X125X60L35 114.65,64.05 r270 top value=2k2
R48 "RC0805JR-0710RL" RESC200X125X60L35 105.3,62.125 r90 top value=10
R49 "RC0805JR-072K2L" RESC200X125X60L35 100.375,58.275 r0 top value=2k2
R50 "RC0805JR-072K2L" RESC200X125X60L35 94.925,62.85 r0 top value=2k2
R51 "RC0805JR-072K2L" RESC200X125X60L35 96.85,58.275 r0 top value=2k2
R52 "RC0805JR-072K2L" RESC200X125X60L35 100.375,60.575 r0 top value=2k2
R53 "RC0805JR-072K2L" RESC200X125X60L35 112.375,60.55 r270 top value=2k2
R54 "RC0805JR-071KL" RESC200X125X60L35 131.635,46.352 r90 top value=1k
R55 "RC0805JR-0710RL" RESC200X125X60L35 106.625,62.3 r180 bottom value=10
R56 "RC0805JR-0710RL" RESC200X125X60L35 117,60.55 r90 top value=10
R57 "RC0805JR-071KL" RESC200X125X60L35 134.139,46.367 r90 top value=1k
R58 "RC0805JR-071KL" RESC200X125X60L35 131.535,37.335 r90 top value=1k
R59 "RC0805JR-0710RL" RESC200X125X60L35 125.7,42.3 r180 top value=10
R60 "RC0805JR-0710RL" RESC200X125X60L35 106.425,50.5 r180 bottom value=10
R61 "RC0805JR-071KL" RESC200X125X60L35 134.039,37.335 r90 top value=1k
R62 "RC0805JR-072K2L" RESC200X125X60L35 92.975,48.1 r0 top value=2k2
R63 "RC0805JR-072K2L" RESC200X125X60L35 96.825,52.2 r0 top value=2k2
R64 "RC0805JR-072K2L" RESC200X125X60L35 100.35,52.175 r0 top value=2k2
R65 "RC0805JR-072K2L" RESC200X125X60L35 100.325,54.5 r0 top value=2k2
R66 "RC0805JR-072K2L" RESC200X125X60L35 111.75,51.55 r0 top value=2k2
R67 "RC0805JR-0710RL" RESC200X125X60L35 105.325,50.5 r90 top value=10
R68 "RC0805JR-072K2L" RESC200X125X60L35 108.25,51.55 r0 top value=2k2
R69 "RC0805JR-072K2L" RESC200X125X60L35 114.625,48.675 r90 top value=2k2
R70 "RC0805JR-072K2L" RESC200X125X60L35 112.325,48.675 r270 top value=2k2
R71 "RC0805JR-0710RL" RESC200X125X60L35 119.9,51.3 r180 top value=10
R72 "RC0805JR-072K2L" RESC200X125X60L35 108.225,42.35 r0 top value=2k2
R73 "RC0805JR-072K2L" RESC200X125X60L35 112.325,45.2 r90 top value=2k2
R74 "RC0805JR-072K2L" RESC200X125X60L35 114.625,45.2 r270 top value=2k2
R75 "RC0805JR-0710RL" RESC200X125X60L35 105.275,43.4 r90 top value=10
R76 "RC0805JR-072K2L" RESC200X125X60L35 100.325,39.375 r0 top value=2k2
R77 "RC0805JR-0747RL" RESC200X125X60L35 88.25,63.65 r270 top value=47
R78 "RC0805JR-072K2L" RESC200X125X60L35 92.975,45.775 r0 top value=2k2
R79 "RC0805JR-072K2L" RESC200X125X60L35 96.75,41.675 r0 top value=2k2
R80 "RC0805JR-072K2L" RESC200X125X60L35 100.325,41.7 r0 top value=2k2
R81 "RC0805JR-072K2L" RESC200X125X60L35 112.3,41.675 r270 top value=2k2
R82 "RC0805JR-0710RL" RESC200X125X60L35 106.425,43.5 r180 bottom value=10
R83 "RC0805JR-0747RL" RESC200X125X60L35 70.7,64.025 r270 top value=47
R84 "RC0805JR-0710RL" RESC200X125X60L35 116.925,41.7 r90 top value=10
R85 "RC0805JR-07100RL" RESC200X125X60L35 61.8,38.491 r180 top value=100
R86 "RC0805JR-0710RL" RESC200X125X60L35 941,97 r0 top value=10
R87 "RC0805JR-0710RL" RESC200X125X60L35 863,97 r0 top value=10
R88 "RC0805JR-0710RL" RESC200X125X60L35 833,126 r0 top value=10
R89 "RC0805JR-07100RL" RESC200X125X60L35 61.8,46.004 r180 top value=100
R90 "RC0805JR-0710RL" RESC200X125X60L35 839,126 r0 top value=10
R91 "RC0805JR-072K2L" RESC200X125X60L35 70.632,48.3 r90 top value=2k2
R92 "RC0805JR-07100RL" RESC200X125X60L35 587,225 r0 top value=100
R93 "RC0805JR-07100RL" RESC200X125X60L35 61.75,40.996 r180 top value=100
R94 "RC0805JR-07100RL" RESC200X125X60L35 61.711,51 r180 top value=100
R95 "RC0805JR-072K2L" RESC200X125X60L35 72.975,48.3 r270 top value=2k2
R96 "RC0805JR-07100RL" RESC200X125X60L35 551,225 r0 top value=100
R97 "RC0805JR-0747RL" RESC200X125X60L35 88.2,48.9 r270 top value=47
R98 "RC0805JR-071KL" RESC200X125X60L35 134.515,94.885 r90 top value=1k
R99 "RC0805JR-071KL" RESC200X125X60L35 139.524,94.83 r90 top value=1k
R100 "RC0805JR-0710RL" RESC200X125X60L35 801,125 r90 top value=10
R101 "RC0805JR-071KL" RESC200X125X60L35 153.064,97.089 r0 top value=1k
R102 "RC0805JR-071KL" RESC200X125X60L35 153.162,94.585 r0 top value=1k
R103 "RC0805JR-071KL" RESC200X125X60L35 133.191,60.804 r90 top value=1k
R104 "RC0805JR-071KL" RESC200X125X60L35 134.2,63.909 r180 top value=1k
R105 "RC0805JR-071KL" RESC200X125X60L35 134.2,66.413 r180 top value=1k
R106 "RC0805JR-071KL" RESC200X125X60L35 151.306,83.904 r0 top value=1k
R107 "RC0805JR-071KL" RESC200X125X60L35 140,65.496 r270 top value=1k
R108 "RC0805JR-071KL" RESC200X125X60L35 140,69.2 r90 top value=1k
R109 "RC0805JR-071KL" RESC200X125X60L35 139.25,78.1 r0 top value=1k
R110 "RC0805JR-071KL" RESC200X125X60L35 139.3,73.091 r180 top value=1k
R111 "RC0805JR-071KL" RESC200X125X60L35 146.8,69.05 r90 top value=1k
R112 "RC0805JR-071KL" RESC200X125X60L35 138.209,56.146 r90 top value=1k
R113 "RC0805JR-071KL" RESC200X125X60L35 138.209,59.85 r90 top value=1k
R114 "RC0805JR-071KL" RESC200X125X60L35 148.4,53.887 r0 top value=1k
R115 "RC0805JR-071KL" RESC200X125X60L35 133.2,57.05 r90 top value=1k
R116 "RC0805JR-071KL" RESC200X125X60L35 157.509,59.683 r90 top value=1k
R117 "RC0805JR-071KL" RESC200X125X60L35 156.604,62.787 r0 top value=1k
R118 "RC0805JR-071KL" RESC200X125X60L35 156.609,65.291 r0 top value=1k
R119 "RC0805JR-071KL" RESC200X125X60L35 150.104,64.785 r180 top value=1k
R120 "RC0805JR-071KL" RESC200X125X60L35 150.104,67.289 r0 top value=1k
R121 "RC0805JR-071KL" RESC200X125X60L35 151.3,77.4 r180 top value=1k
R122 "RC0805JR-071KL" RESC200X125X60L35 152.5,54.85 r90 top value=1k
R123 "RC0805JR-071KL" RESC200X125X60L35 152.5,58.65 r90 top value=1k
R124 "RC0805JR-071KL" RESC200X125X60L35 157.509,55.979 r90 top value=1k
R125 "RC0805JR-0710RL" RESC200X125X60L35 622,125 r90 top value=10
R126 "RC0805JR-0710RL" RESC200X125X60L35 558,125 r90 top value=10
R127 "RC0805JR-0710RL" RESC200X125X60L35 447,125 r90 top value=10
R128 "RC0805JR-0710RL" RESC200X125X60L35 454,125 r90 top value=10
R129 "RC0805JR-0710RL" RESC200X125X60L35 366,125 r90 top value=10
R130 "RC0805JR-0710RL" RESC200X125X60L35 373,125 r90 top value=10
R131 "RC0805JR-07100KL" RESC200X125X60L35 971,97 r90 top value=100k
R132 "RC0805JR-07100KL" RESC200X125X60L35 978,97 r90 top value=100k
R133 "RC0805JR-07100KL" RESC200X125X60L35 952,97 r90 top value=100k
R134 "RC0805JR-07100KL" RESC200X125X60L35 959,97 r90 top value=100k
R135 "RC0805JR-07100KL" RESC200X125X60L35 926,97 r90 top value=100k
R136 "RC0805JR-07100KL" RESC200X125X60L35 933,97 r90 top value=100k
R137 "RC0805JR-0710RL" RESC200X125X60L35 823,97 r90 top value=10
R138 "RC0805JR-0710RL" RESC200X125X60L35 830,97 r90 top value=10
R139 "RC0805JR-0710RL" RESC200X125X60L35 837,97 r90 top value=10
R140 "RC0805JR-0710RL" RESC200X125X60L35 761,97 r90 top value=10
R141 "RC0805JR-07100KL" RESC200X125X60L35 467,97 r90 top value=100k
R142 "RC0805JR-07100KL" RESC200X125X60L35 474,97 r90 top value=100k
R143 "RC0805JR-07100KL" RESC200X125X60L35 460,97 r90 top value=100k
R144 "RC0805JR-07100KL" RESC200X125X60L35 424,97 r90 top value=100k
R145 "RC0805JR-07100KL" RESC200X125X60L35 417,97 r90 top value=100k
R146 "RC0805JR-07100KL" RESC200X125X60L35 356,97 r90 top value=100k
R147 "RC0805JR-0710RL" RESC200X125X60L35 646,125 r90 top value=10
R148 "RC0805JR-07100RL" RESC200X125X60L35 61.8,43.5 r180 top value=100
R149 "RC0805JR-071KL" RESC200X125X60L35 133.3,82.1 r90 top value=1k
R150 "RC0805JR-071KL" RESC200X125X60L35 157.6,80.8 r90 top value=1k
U1 "EP4CE22E22C6" EQFP144_N 396,58 r0 top
U2 "STM32F103CBT6" LQFP48_N 682,122 r0 top
U3 "W25Q" SO_8_W 514,122 r90 top
X1 "C_P" C_P 367,90 r90 top value=0
X2 "C_P" C_P 375,90 r90 top value=0
X3 "C_P" C_P 382,90 r90 top value=0
X4 "C_P" C_P 390,90 r90 top value=0
X5 "C_P" C_P 398,90 r90 top value=0
X6 "C_P" C_P 405,90 r90 top value=0
X7 "Обозначение при заказе" HC-49 718,92 r90 top
X8 "C_P" C_P 386,218 r90 top value=0
X9 "C_P" C_P 394,218 r90 top value=0
X10 "C_P" C_P 402,218 r90 top value=0
X11 "C_P" C_P 409,218 r90 top value=0
X12 "C_P" C_P 417,218 r90 top value=0
X13 "C_P" C_P 425,218 r90 top value=0
X14 "C_P" C_P 379,218 r90 top value=0
X15 "C_P" C_P 413,90 r90 top value=0
X16 "Обозначение при заказе" ST-008G-04 563,199 r90 top
X17 "Обозначение при заказе" HC-49 667,121 r90 top
X19 "Обозначение при заказе" ST-008G-04 158.9,108.6 r180 top
X20 "C_P" C_P 367,252 r90 top value=0
X21 "C_P" C_P 360,252 r90 top value=0

## Footprints (in the part's own frame and the unit in brackets; to place one, negate y for a bottom-side part, rotate by r counter-clockwise, add the part's x,y. Pads: shape width x height; smd on the part's side, far side on the other; paste and mask are expansions set on the pad)
"48-QFN (6x6)" [mm] "6x6 mm, pitch 0.4 mm, power pad"
  round 0.7 hole 0.3: 0(-1.5,-1.5) 0(-1.5,0) 0(-1.5,1.5) 0(0,-1.5) 0(0,0) 0(0,1.5) 0(1.5,-1.5) 0(1.5,0) 0(1.5,1.5)
  rect 4.4x4.4 smd: 0(0,0)
  rect 0.8x0.25 smd: 1(-2.9,2.2) 2(-2.9,1.8) 3(-2.9,1.4) 4(-2.9,1) 5(-2.9,0.6) 6(-2.9,0.2) 7(-2.9,-0.2) 8(-2.9,-0.6) 9(-2.9,-1) 10(-2.9,-1.4) 11(-2.9,-1.8) 12(-2.9,-2.2) 25(2.9,-2.2) 26(2.9,-1.8) 27(2.9,-1.4) 28(2.9,-1) 29(2.9,-0.6) 30(2.9,-0.2) 31(2.9,0.2) 32(2.9,0.6) 33(2.9,1) 34(2.9,1.4) 35(2.9,1.8) 36(2.9,2.2)
  rect 0.25x0.8 smd: 13(-2.2,-2.9) 14(-1.8,-2.9) 15(-1.4,-2.9) 16(-1,-2.9) 17(-0.6,-2.9) 18(-0.2,-2.9) 19(0.2,-2.9) 20(0.6,-2.9) 21(1,-2.9) 22(1.4,-2.9) 23(1.8,-2.9) 24(2.2,-2.9) 37(2.2,2.9) 38(1.8,2.9) 39(1.4,2.9) 40(1,2.9) 41(0.6,2.9) 42(0.2,2.9) 43(-0.2,2.9) 44(-0.6,2.9) 45(-1,2.9) 46(-1.4,2.9) 47(-1.8,2.9) 48(-2.2,2.9)
  round 0.5 on Mech1 mask+0: ""(-2.5,2.5)
  silkscreen extent -3.72,-3 3,3.12, body extent -3.02,-3.02 3.02,3.02, height 0.85
adum1400 [mm]
  rect 0.6x2.2 smd: 1(-4.445,-4.6) 2(-3.175,-4.6) 3(-1.905,-4.6) 4(-0.635,-4.6) 5(0.635,-4.6) 6(1.905,-4.6) 7(3.175,-4.6) 8(4.445,-4.6) 9(4.445,4.6) 10(3.175,4.6) 11(1.905,4.6) 12(0.635,4.6) 13(-0.635,4.6) 14(-1.905,4.6) 15(-3.175,4.6) 16(-4.445,4.6)
  silkscreen extent -6,-6 5.5,6, body extent -6.4,-5.15 6.4,5.15, height 2.64
AM3D-0509DH30Z [mm]
  round 1.5 hole 0.7: 1(0,1.27) 2(2.54,1.27) 4(7.62,1.27) 5(10.16,1.27) 6(12.7,1.27) 7(15.24,1.27)
  silkscreen extent -2.54,-5.08 17.78,2.54
AM3D-0509SZ [mm]
  round 1.5 hole 0.7: 1(0,1.27) 2(2.54,1.27) 4(7.62,1.27) 5(10.16,1.27) 6(12.7,1.27) 7(15.24,1.27)
  silkscreen extent -2.54,-5.08 17.78,2.54
C_P [mm]
  round 3 hole 1: 1(0,0)
CAPAE1030X1050L320X90N [mm] "Capacitor, Aluminum Electrolytic; 10.30 mm L X 10.30 mm W X 10.50 mm H body"
  rrect23% 4x2.15 smd: 1(-4.245,0) 2(4.245,0)
  silkscreen extent -5.25,-5.26 5.25,5.26, body extent -5.5,-5.15 5.5,5.15, height 10.5
CAPC200X125X95L50N [mm] "Capacitor, Chip; 2.00 mm L X 1.25 mm W X 0.95 mm H body"
  rrect48% 1.1x1.4 smd: 1(-0.95,0) 2(0.95,0)
  silkscreen extent -0.3,-0.9 0.3,0.9, body extent -1,-0.62 1,0.63, height 0.95
CAPC320X160X180L55 [mm] "Capacitor, Chip; 3.20 mm L X 1.60 mm W X 1.80 mm H body"
  rrect36% 1.4x1.8 smd: 1(-1.6,0) 2(1.6,0)
  silkscreen extent -0.61,-0.85 0.61,0.85, body extent -1.6,-0.8 1.6,0.8, height 1.8
DIL4 [mm]
  round 1.5 hole 0.6: 1(0,0) 2(7.62,0) 3(7.62,7.62) 4(0,7.62)
  silkscreen extent -2.54,-2.54 10.16,10.16
EQFP144_N [mm] "Thin QFP, 144-Leads, Body 20x20mm, Pitch 0.5mm, IPC Medium Density"
  oval 1.8x0.3 smd: 1(-10.55,8.75) 2(-10.55,8.25) 3(-10.55,7.75) 4(-10.55,7.25) 5(-10.55,6.75) 6(-10.55,6.25) 7(-10.55,5.75) 8(-10.55,5.25) 9(-10.55,4.75) 10(-10.55,4.25) 11(-10.55,3.75) 12(-10.55,3.25) 13(-10.55,2.75) 14(-10.55,2.25) 15(-10.55,1.75) 16(-10.55,1.25) 17(-10.55,0.75) 18(-10.55,0.25) 19(-10.55,-0.25) 20(-10.55,-0.75) 21(-10.55,-1.25) 22(-10.55,-1.75) 23(-10.55,-2.25) 24(-10.55,-2.75) 25(-10.55,-3.25) 26(-10.55,-3.75) 27(-10.55,-4.25) 28(-10.55,-4.75) 29(-10.55,-5.25) 30(-10.55,-5.75) 31(-10.55,-6.25) 32(-10.55,-6.75) 33(-10.55,-7.25) 34(-10.55,-7.75) 35(-10.55,-8.25) 36(-10.55,-8.75) 73(10.55,-8.75) 74(10.55,-8.25) 75(10.55,-7.75) 76(10.55,-7.25) 77(10.55,-6.75) 78(10.55,-6.25) 79(10.55,-5.75) 80(10.55,-5.25) 81(10.55,-4.75) 82(10.55,-4.25) 83(10.55,-3.75) 84(10.55,-3.25) 85(10.55,-2.75) 86(10.55,-2.25) 87(10.55,-1.75) 88(10.55,-1.25) 89(10.55,-0.75) 90(10.55,-0.25) 91(10.55,0.25) 92(10.55,0.75) 93(10.55,1.25) 94(10.55,1.75) 95(10.55,2.25) 96(10.55,2.75) 97(10.55,3.25) 98(10.55,3.75) 99(10.55,4.25) 100(10.55,4.75) 101(10.55,5.25) 102(10.55,5.75) 103(10.55,6.25) 104(10.55,6.75) 105(10.55,7.25) 106(10.55,7.75) 107(10.55,8.25) 108(10.55,8.75)
  oval 0.3x1.8 smd: 37(-8.75,-10.55) 38(-8.25,-10.55) 39(-7.75,-10.55) 40(-7.25,-10.55) 41(-6.75,-10.55) 42(-6.25,-10.55) 43(-5.75,-10.55) 44(-5.25,-10.55) 45(-4.75,-10.55) 46(-4.25,-10.55) 47(-3.75,-10.55) 48(-3.25,-10.55) 49(-2.75,-10.55) 50(-2.25,-10.55) 51(-1.75,-10.55) 52(-1.25,-10.55) 53(-0.75,-10.55) 54(-0.25,-10.55) 55(0.25,-10.55) 56(0.75,-10.55) 57(1.25,-10.55) 58(1.75,-10.55) 59(2.25,-10.55) 60(2.75,-10.55) 61(3.25,-10.55) 62(3.75,-10.55) 63(4.25,-10.55) 64(4.75,-10.55) 65(5.25,-10.55) 66(5.75,-10.55) 67(6.25,-10.55) 68(6.75,-10.55) 69(7.25,-10.55) 70(7.75,-10.55) 71(8.25,-10.55) 72(8.75,-10.55) 109(8.75,10.55) 110(8.25,10.55) 111(7.75,10.55) 112(7.25,10.55) 113(6.75,10.55) 114(6.25,10.55) 115(5.75,10.55) 116(5.25,10.55) 117(4.75,10.55) 118(4.25,10.55) 119(3.75,10.55) 120(3.25,10.55) 121(2.75,10.55) 122(2.25,10.55) 123(1.75,10.55) 124(1.25,10.55) 125(0.75,10.55) 126(0.25,10.55) 127(-0.25,10.55) 128(-0.75,10.55) 129(-1.25,10.55) 130(-1.75,10.55) 131(-2.25,10.55) 132(-2.75,10.55) 133(-3.25,10.55) 134(-3.75,10.55) 135(-4.25,10.55) 136(-4.75,10.55) 137(-5.25,10.55) 138(-5.75,10.55) 139(-6.25,10.55) 140(-6.75,10.55) 141(-7.25,10.55) 142(-7.75,10.55) 143(-8.25,10.55) 144(-8.75,10.55)
  rect 4.3x4.3 smd: 145(0,0)
  silkscreen extent -10.67,-9.25 9.25,9.57, body extent -10,-10 10,10, height 1.6
HC-49 [mm]
  round 1.03 hole 0.63: 1(-2.44,0) 2(2.44,0)
  silkscreen extent -5.68,-2.33 5.68,2.33, body extent -5.7,-2.5 5.65,2.5, height 13.56
HDR1X3 [mm] "Connector; Header; 3 Position"
  rect 1.5x1.5 hole 0.9: 1(0,0)
  round 1.5 hole 0.9: 2(2.54,0) 3(5.08,0)
  silkscreen extent -1.27,-1.27 6.35,1.27
HDR2X5 [mm] "Connector; Header; 5x2 Position"
  rect 1.5x1.5 hole 0.9: 1(0,0)
  round 1.5 hole 0.9: 2(0,2.54) 3(2.54,0) 4(2.54,2.54) 5(5.08,0) 6(5.08,2.54) 7(7.62,0) 8(7.62,2.54) 9(10.16,0) 10(10.16,2.54)
  silkscreen extent -1.27,-1.27 11.43,3.81
INDM320X250X220L90X200N [mm] "Inductor, Molded Body; 3.20 mm L X 2.50 mm W X 2.20 mm H body"
  round 1 smd: 1(-1.15,0) 2(1.15,0)
  Top Layer region: 2.75,-0.5 2.75,0.5 1.75,0.5 1.75,1.1 0.65,1.1 0.65,-1.1 1.75,-1.1 1.75,-0.5
  Top Layer region: -2.75,0.5 -2.75,-0.5 -1.75,-0.5 -1.75,-1.1 -0.65,-1.1 -0.65,1.1 -1.75,1.1 -1.75,0.5
  silkscreen extent -1.75,-1.45 1.75,1.45, body extent -1.6,-1.25 1.6,1.25, height 2.2
INDM730X730X450L90X180N [mm] "Inductor, Molded Body; 7.30 mm L X 7.30 mm W X 4.50 mm H body"
  rrect12% 1.6x2.2 smd: 1(-3.2,0) 2(3.2,0)
  silkscreen extent -3.95,-3.95 3.95,3.95, body extent -3.75,-3.75 3.75,3.75, height 4.5
LQFP48_N [mm] "Thin QFP, 48-Leads, Body 7x7mm, Pitch 0.5mm, IPC Medium Density"
  oval 1.8x0.3 smd: 1(-4.05,2.75) 2(-4.05,2.25) 3(-4.05,1.75) 4(-4.05,1.25) 5(-4.05,0.75) 6(-4.05,0.25) 7(-4.05,-0.25) 8(-4.05,-0.75) 9(-4.05,-1.25) 10(-4.05,-1.75) 11(-4.05,-2.25) 12(-4.05,-2.75) 25(4.05,-2.75) 26(4.05,-2.25) 27(4.05,-1.75) 28(4.05,-1.25) 29(4.05,-0.75) 30(4.05,-0.25) 31(4.05,0.25) 32(4.05,0.75) 33(4.05,1.25) 34(4.05,1.75) 35(4.05,2.25) 36(4.05,2.75)
  oval 0.3x1.8 smd: 13(-2.75,-4.05) 14(-2.25,-4.05) 15(-1.75,-4.05) 16(-1.25,-4.05) 17(-0.75,-4.05) 18(-0.25,-4.05) 19(0.25,-4.05) 20(0.75,-4.05) 21(1.25,-4.05) 22(1.75,-4.05) 23(2.25,-4.05) 24(2.75,-4.05) 37(2.75,4.05) 38(2.25,4.05) 39(1.75,4.05) 40(1.25,4.05) 41(0.75,4.05) 42(0.25,4.05) 43(-0.25,4.05) 44(-0.75,4.05) 45(-1.25,4.05) 46(-1.75,4.05) 47(-2.25,4.05) 48(-2.75,4.05)
  silkscreen extent -4.17,-2.75 2.75,3.57, body extent -3.5,-3.5 3.5,3.5, height 1.6
QFP50P900X900X160-48N [mm]
  rrect50% 1.56x0.28 smd: 1(-4.18,2.75) 2(-4.18,2.25) 3(-4.18,1.75) 4(-4.18,1.25) 5(-4.18,0.75) 6(-4.18,0.25) 7(-4.18,-0.25) 8(-4.18,-0.75) 9(-4.18,-1.25) 10(-4.18,-1.75) 11(-4.18,-2.25) 12(-4.18,-2.75) 25(4.18,-2.75) 26(4.18,-2.25) 27(4.18,-1.75) 28(4.18,-1.25) 29(4.18,-0.75) 30(4.18,-0.25) 31(4.18,0.25) 32(4.18,0.75) 33(4.18,1.25) 34(4.18,1.75) 35(4.18,2.25) 36(4.18,2.75)
  rrect50% 0.28x1.56 smd: 13(-2.75,-4.18) 14(-2.25,-4.18) 15(-1.75,-4.18) 16(-1.25,-4.18) 17(-0.75,-4.18) 18(-0.25,-4.18) 19(0.25,-4.18) 20(0.75,-4.18) 21(1.25,-4.18) 22(1.75,-4.18) 23(2.25,-4.18) 24(2.75,-4.18) 37(2.75,4.18) 38(2.25,4.18) 39(1.75,4.18) 40(1.25,4.18) 41(0.75,4.18) 42(0.25,4.18) 43(-0.25,4.18) 44(-0.75,4.18) 45(-1.25,4.18) 46(-1.75,4.18) 47(-2.25,4.18) 48(-2.75,4.18)
  silkscreen extent -6.15,-3.6 3.6,3.6, body extent -4.5,-4.5 4.5,4.5, height 1.48
RESC200X125X60L35 [mm] "Resistor, Chip; 2.00 mm L X 1.25 mm W X 0.60 mm H body"
  rrect46% 1.1x1.4 smd: 1(-0.95,0) 2(0.95,0)
  silkscreen extent -0.3,-0.9 0.3,0.9, body extent -1,-0.63 1,0.62, height 0.6
RESC310X160X65L40N [mm] "Resistor, Chip; 3.10 mm L X 1.60 mm W X 0.65 mm H body"
  rrect36% 1.4x1.8 smd: 1(-1.6,0) 2(1.6,0)
  silkscreen extent -0.61,-0.85 0.61,0.85, body extent -1.55,-0.8 1.55,0.8, height 0.65
RK09L [mm]
  round 3 hole 2: 0(-5.8,-4.7) 0(-5.8,4.7)
  round 2 hole 1.2: 1(-2.5,2.5) 2(-2.5,0) 3(-2.5,-2.5) 4(0,-2.5) 5(0,0) 6(0,2.5)
  silkscreen extent -7.5,-7.5 5,7.5, body extent -7.3,-6.05 20.1,6.05, height 11.85
SAMTEC_USB-B-S-X-X-TH-TR [mm]
  rect 1.408x1.408 hole 0.9: 1(1.25,4.7)
  round 1.408 hole 0.9: 2(-1.25,4.7) 3(-1.25,2.7) 4(1.25,2.7)
  round 3.316 hole 2.3: S1(-6.02,0) S2(6.02,0)
  silkscreen extent -6.05,-10.4 6.85,5.8
SO_8_W [mm]
  oval 2x0.6 smd: 1(-3.673,1.651) 2(-3.673,0.381) 3(-3.673,-0.889) 4(-3.673,-2.159) 5(3.927,-2.159) 6(3.927,-0.889) 7(3.927,0.381) 8(3.927,1.651)
  silkscreen extent -3.77,-2.95 2.93,2.55, body extent -3.92,-2.98 4.18,2.48, height 1.75
SOIC8P127_490X600X175L65X42N [mm] "Small Outline IC (SOIC), 1.27 mm pitch; 8 pin, 4.905 mm L X 3.90 mm W X 1.75 mm H body"
  rect 1.6x0.65 smd: 1(-2.7,1.905)
  rrect49% 1.6x0.65 smd: 2(-2.7,0.635) 3(-2.7,-0.635) 4(-2.7,-1.905) 5(2.7,-1.905) 6(2.7,-0.635) 7(2.7,0.635) 8(2.7,1.905)
  silkscreen extent -3.39,-2.53 2,2.53, body extent -3,-2.45 3,2.45, height 1.75
SOIC8P127_490X600X175L83X42N [mm] "Small Outline IC (SOIC), 1.27 mm pitch; 8 pin, 4.905 mm L X 3.90 mm W X 1.75 mm H body"
  rect 2.1x0.65 smd: 1(-2.44,1.905)
  rrect49% 2.1x0.65 smd: 2(-2.44,0.635) 3(-2.44,-0.635) 4(-2.44,-1.905) 5(2.44,-1.905) 6(2.44,-0.635) 7(2.44,0.635) 8(2.44,1.905)
  silkscreen extent -3.39,-2.53 2,2.53, body extent -3,-2.45 3,2.45, height 1.75
SOIC8P127_528X790X100L65X41N [mm] "Small Outline IC, 1.27 mm pitch; 8 pin, 5.33 mm L X 5.33 mm W X 2.16 mm H body"
  rect 1.7x0.65 smd: 1(-3.554,1.905)
  rrect49% 1.7x0.65 smd: 2(-3.554,0.635) 3(-3.554,-0.635) 4(-3.554,-1.905) 5(3.554,-1.905) 6(3.554,-0.635) 7(3.554,0.635) 8(3.554,1.905)
  silkscreen extent -4.3,-2.72 2.51,2.72, body extent -3.95,-2.62 3.95,2.62, height 2.16
SOP65P490X110-9N [mil]
  rect 56x17 smd: 1(-86,38) 2(-86,13) 3(-86,-13) 4(-86,-38) 5(86,-38) 6(86,-13) 7(86,13) 8(86,38)
  rect 62x74 smd: 9(0,0)
  silkscreen extent -61,-61 61,61
SOT23-5P95_280X145L45X40N [mm] "Small Outline Transistor (SOT23), 0.95 mm pitch; 5 pin, 2.90 mm L X 1.60 mm W X 1.45 mm H body"
  rect 0.65x1.16 smd: 1(-0.95,-1.23)
  rrect51% 0.65x1.16 smd: 2(0,-1.23) 3(0.95,-1.23) 4(0.95,1.23) 5(-0.95,1.23)
  silkscreen extent -1.55,-1.71 1.55,0.88, body extent -1.45,-1.4 1.45,1.4, height 1.45
SOT23-6P95_280X145L45X40N [mm] "Small Outline Transistor (SOT23), 0.95 mm pitch; 6 pin, 2.90 mm L X 1.60 mm W X 1.45 mm H body"
  rect 1.16x0.6 smd mask+0.05: 1(-1.23,0.95)
  rrect51% 1.16x0.6 smd mask+0.05: 2(-1.23,0) 3(-1.23,-0.95) 4(1.23,-0.95) 5(1.23,0) 6(1.23,0.95)
  silkscreen extent -1.71,-1.65 0.88,1.65, body extent -1.4,-1.45 1.4,1.45, height 1.45
ST-008G-04 [mm]
  round 4 hole 2.5: 1(7.5,0) 2(22.5,2.5) 3(22.5,-2.5)
  silkscreen extent 0,-7.5 27.5,7.5
SWITCHCRAFT_57PC5F [mm]
  rect 2.1x2.1 / inner round 2.1 / far side rect 2.1x2.1 hole 1.4: 1(5.01,-7.505)
  round 2.1 hole 1.4: 2(5.01,0) 3(5.01,7.505) 4(7.5,-5.005) 5(7.5,5.005) G1(-5,2.5) G2(-5,-2.5)
  round 2.39 hole 2.39 unplated mask+0.254: ""(0,-7.505) ""(0,7.505)
  silkscreen extent -7.49,-10.7 8.01,10, body extent -7.49,-10.03 8,9.93, height 23.7
TANT_B [mm]
  rrect50% 1.6x2.8 smd: 1(0,0) 2(3.5,0)
  silkscreen extent -1.75,-1.75 4.75,1.75, body extent 0,-1.3 3.5,1.5, height 2.1
TANT_D [mm]
  rrect50% 2.6x2.6 smd: 1(0,0) 2(7.3,0)
  silkscreen extent -2.2,-2.3 9,2.3, body extent -0.05,-2.2 7.25,2.1, height 3.1